# Altium PCB DAQ.PcbDoc
Units mm, origin at the board's own origin, x right, y up, seen from the top; angles counter-clockwise.
Board outline 60 x 100 mm, 4 copper layers (Signal 1, GND 1, GND 2, Signal 2), stack 0.603 mm thick; 40 components, 48 nets, 231 pads, 236 vias.
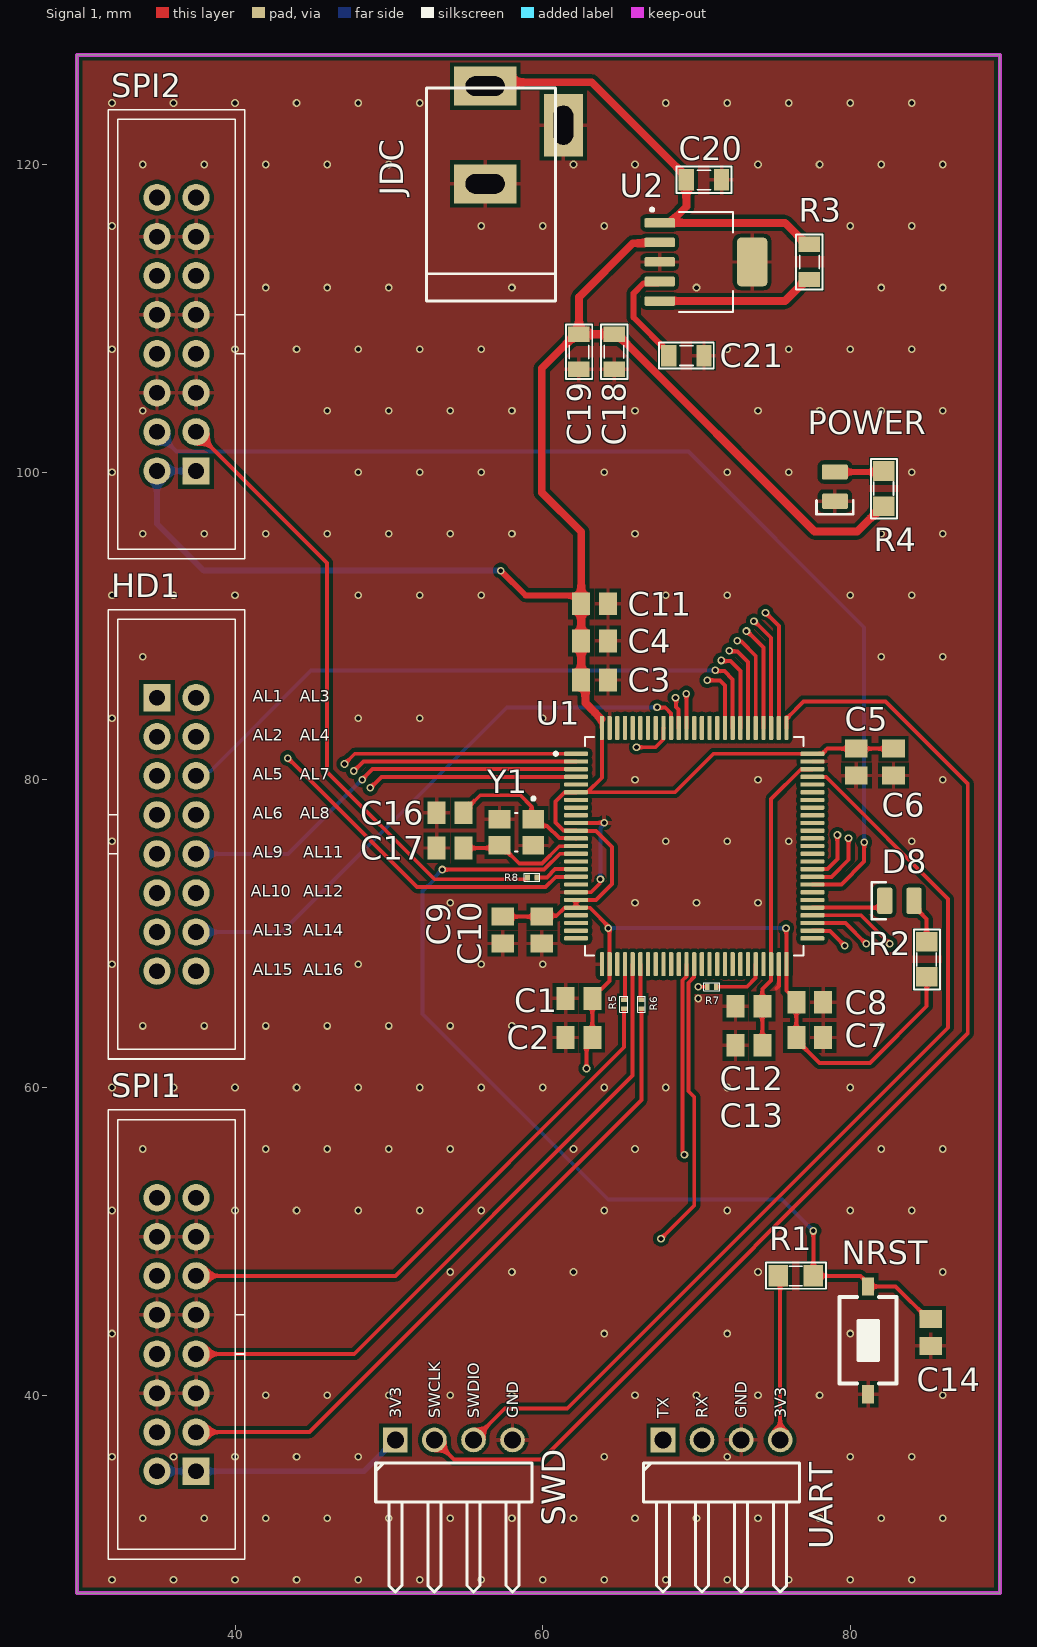
[diagram p0: Signal 1 view]
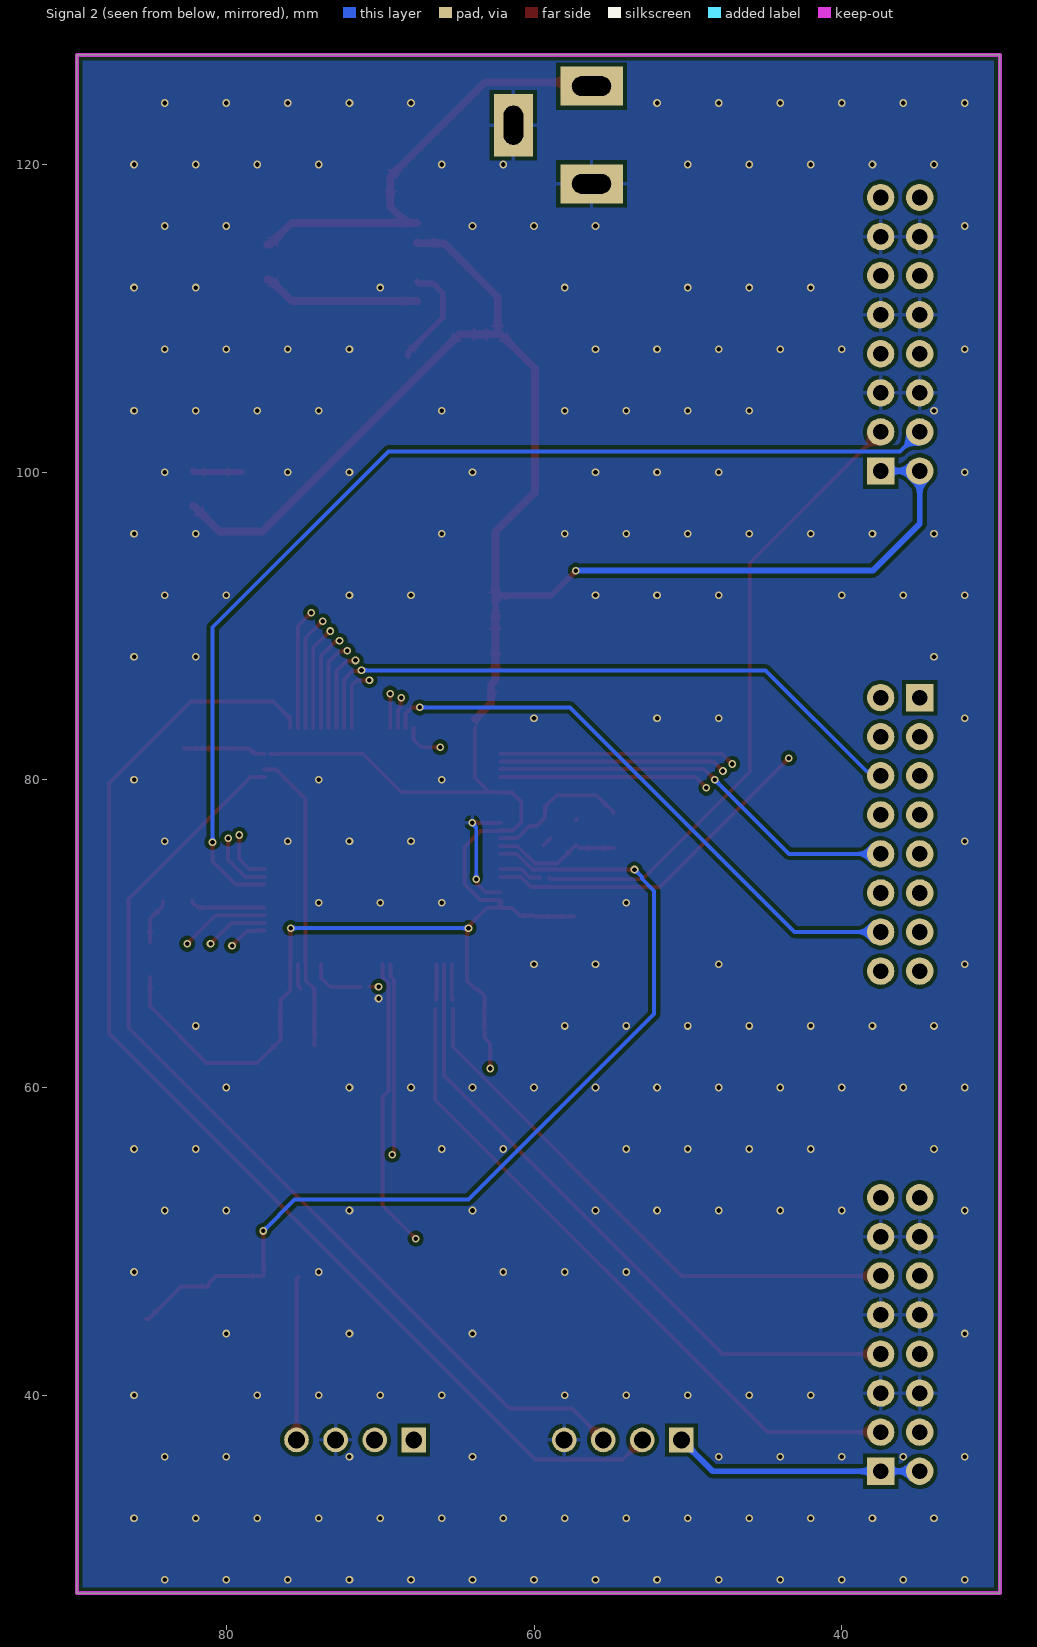
[diagram p1: Signal 2 view, seen from below]
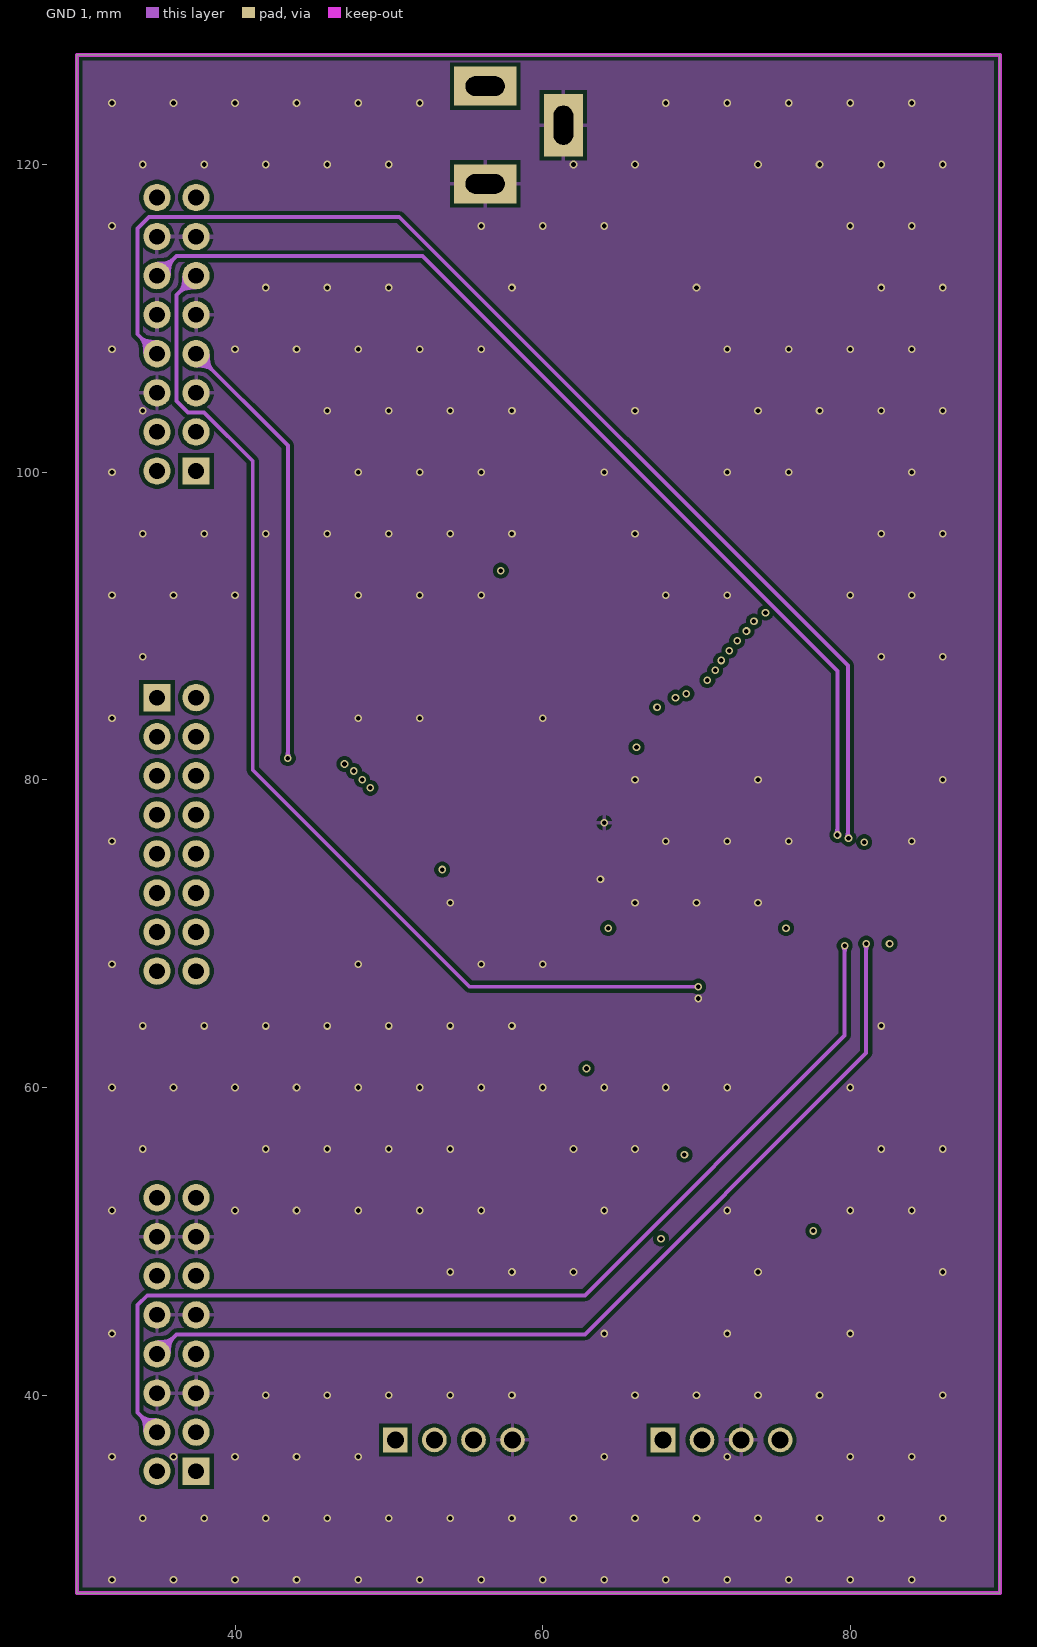
[diagram p2: GND 1]
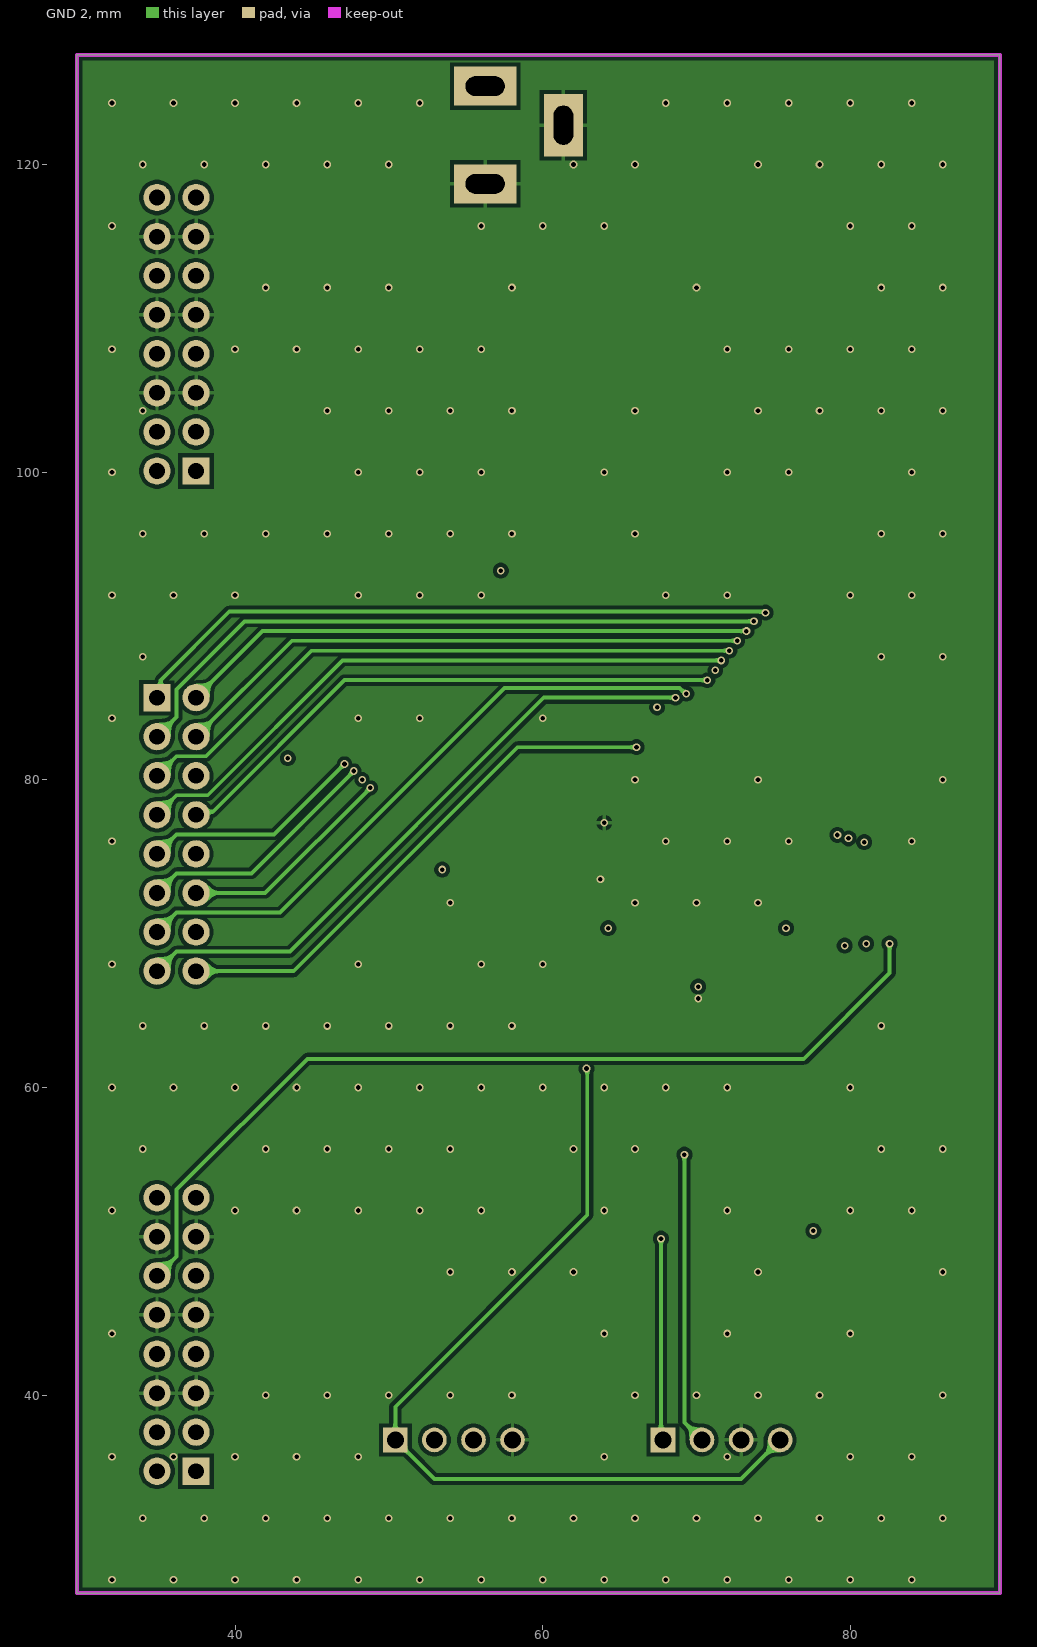
[diagram p3: GND 2]
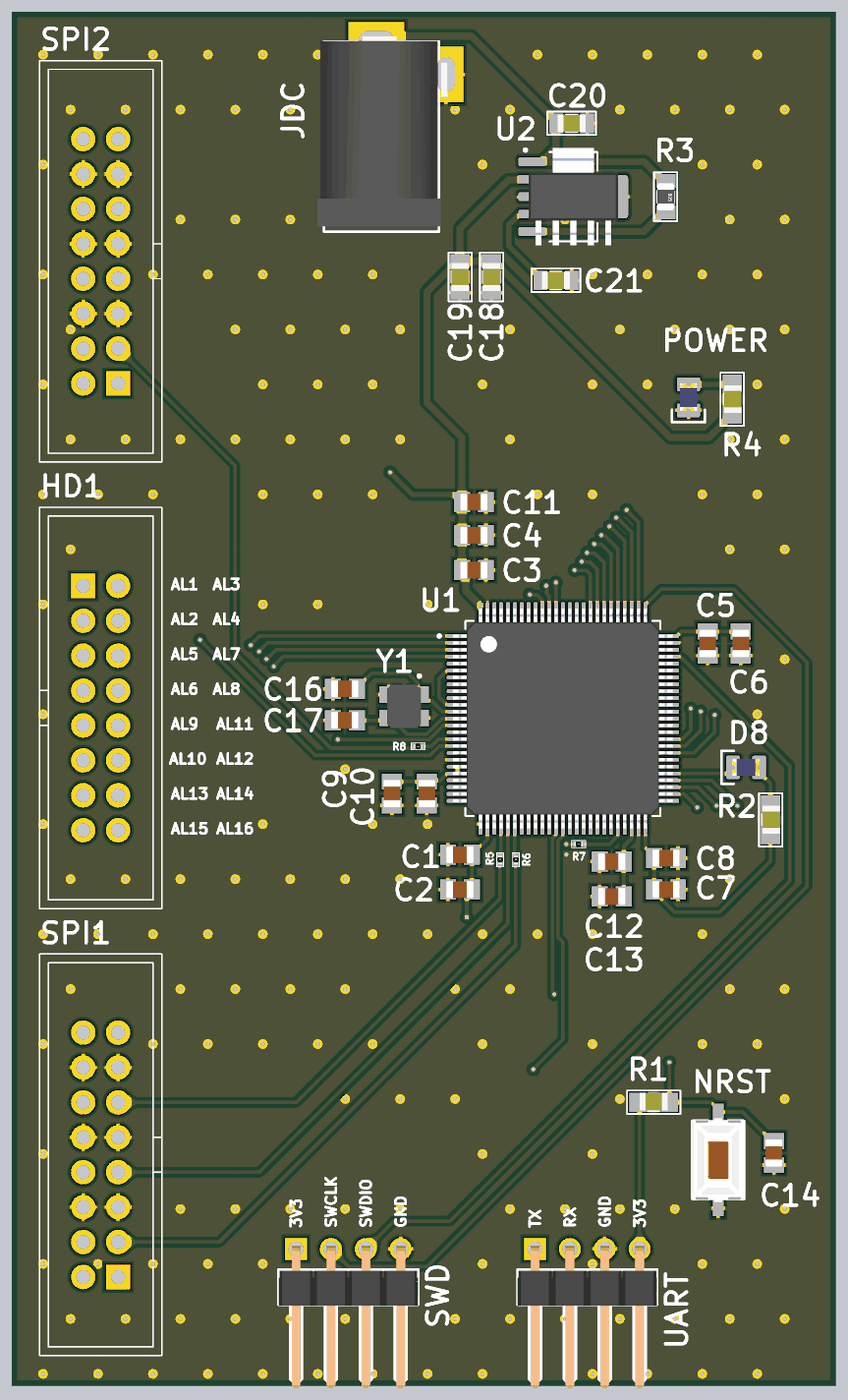
[diagram p4: 3D render of the assembled board from above, using the file's embedded part models]

## Layer stack, top to bottom
Top Solder: solder mask 0.0102, Solder Resist, Dk 3.5
Signal 1: signal copper 0.035
Dielectric 2: prepreg 0.0711, PP-006, Dk 4.1
GND 1: signal copper 0.0356
Dielectric 1: dielectric 0.32, FR-4, Dk 4.8
GND 2: signal copper 0.0356
Dielectric 3: prepreg 0.0711, PP-006, Dk 4.1
Signal 2: signal copper 0.035
Bottom Solder: solder mask 0.0102, Solder Resist, Dk 3.5

## Board outline
29.718,27.127 29.718,127.127 89.718,127.127 89.718,27.127

## Design rules (kind name [scope] priority, off if disabled: settings)
Clearance [All] p1: gap=0.254 ignorepadtopadclearanceinfootprint=TRUE except(0.127: Arc-Arc Arc-Track Arc-SMDPad Track-Track Track-SMDPad SMDPad-SMDPad)
PolygonConnect [All] p1: connectstyle=Relief reliefconductorwidth=0.254 reliefentries=4 polygonreliefangle="90 Angle" airgapwidth=0.254
RoutingVias [All] p1: holewidth=0.3 width=0.5 viastyle="Through Hole" minholewidth=0.2 minwidth=0.3 maxholewidth=0.711 maxwidth=1.277
SolderMaskExpansion [All] p1: expansion=0.102 istentingtop=FALSE
UnRoutedNet [All] p1: checkbadconnections=TRUE
Width [All] p1: maxlimit=1.27 minlimit=0.254 preferedwidth=0.254 minimp=50.000000 maximp=50.000000 favimp=50.000000
29 further rules are at their usual default settings.

## Classes and differential pairs
component class POWER: C18 C19 C20 C21 JDC POWER R3 R4 U2
component class MCU: C1 C2 C3 C4 C5 C6 C7 C8 C9 C10 C11 C12 C13 C14 C16 C17 D8 HD1 NRST R1 R2 R5 R6 R7 R8 spi1 SPI1 SPI2 SWD U1 UART Y1

## Components (designator, comment, footprint, x,y, rotation, side; value= is the part's Value field where it differs from the comment)
C1 "100nF" CAPC2012X145N 62.357,65.786 r0 top
C2 "100nF" CAPC2012X145N 62.357,63.246 r0 top
C3 "100nF" CAPC2012X145N 63.373,86.487 r180 top
C4 "100nF" CAPC2012X145N 63.373,89.027 r180 top
C5 "100nF" CAPC2012X145N 80.391,81.153 r90 top
C6 "100nF" CAPC2012X145N 82.804,81.153 r90 top
C7 "100nF" CAPC2012X145N 77.361,63.246 r180 top
C8 "100nF" CAPC2012X145N 77.361,65.532 r180 top
C9 "100nF" CAPC2012X145N 57.404,70.231 r90 top
C10 "100nF" CAPC2012X145N 59.944,70.231 r90 top
C11 "4.7uF" CAPC2012X145N 63.373,91.44 r180 top
C12 "2.2uF" CAPC2012X145N 73.406,65.278 r0 top
C13 "2.2uF" CAPC2012X145N 73.406,62.738 r0 top
C14 "100nF" CAPC2012X145N 85.217,44.069 r90 top
C16 "10pF" CAPC2012X145N 53.975,77.851 r0 top
C17 "10pF" CAPC2012X145N 53.975,75.565 r0 top
C18 "1uF" CAP_0805 64.643,107.823 r90 top value=33p
C19 "1uF" CAP_0805 62.357,107.823 r90 top value=33p
C20 "1uF" CAP_0805 70.485,118.999 r180 top value=33p
C21 "1uF" CAP_0805 69.342,107.569 r180 top value=33p
D8 "BLUE" LED_0805_BLUE 83.185,72.136 r0 top
HD1 "IDC 8X2" IDC16 34.925,85.344 r270 top value="Header 5x2"
JDC "Jac DC" DC-IN 58.801,121.92 r90 top
NRST "SW-SMD" SW-SMD 81.153,43.561 r270 top
POWER "BLUE" LED_0805_BLUE 78.994,99.06 r90 top
R1 "10K" SM-0805 76.454,47.752 r180 top value=1K
R2 "1K" SM-0805 84.963,68.326 r90 top
R3 "0R" RES-SMD-0805 77.343,113.665 r270 top
R4 "1K" SM-0805 82.169,98.933 r90 top
R5 "22R" RES-SMD-0201 65.278,65.405 r270 top
R6 "22R" RES-SMD-0201 66.421,65.405 r270 top
R7 "22R" RES-SMD-0201 70.993,66.548 r180 top
R8 "22R" RES-SMD-0201 59.309,73.66 r180 top
SPI1 "IDC 8X2" IDC16 37.465,35.052 r90 top value="Header 5x2"
SPI2 "IDC 8X2" IDC16 37.465,100.076 r90 top value="Header 5x2"
SWD "JP4" JP4-D1C 59.309,34.544 r0 top
U1 "STM32H743VIT6" QFP50P1600X1600X160-100N 69.85,75.692 r0 top
U2 "TPS73733DCQ" SOT127P706X180-6N 70.612,113.665 r0 top
UART "JP4" JP4-D1C 76.708,34.544 r0 top
Y1 "25MHz" XTAL_ABM8G-25.000MHZ-B4Y-T 58.293,76.581 r270 top

## Footprints (in the part's own frame and the unit in brackets; to place one, negate y for a bottom-side part, rotate by r counter-clockwise, add the part's x,y. Pads: shape width x height; smd on the part's side, far side on the other; paste and mask are expansions set on the pad)
CAP_0805 [mil]
  rect 39.37x55 smd: 1(-45,0) 2(45,0)
  silkscreen extent -70,-34 70,33, body extent -40,-25 40,25, height 24
CAPC2012X145N [mm]
  rect 1.17x1.47 smd: 1(-0.871,0) 2(0.871,0)
  body extent -1,-0.63 1,0.63, height 1.45
DC-IN [mil] "Jac DC input"
  rect 100x160 hole 50 slot 100 at 90 deg: 1(125,100) 2(-125,100)
  rect 160x100 hole 50 slot 100 at 0 deg: 3(25,-100)
  silkscreen extent -425,-80 120,250, body extent -410,-105 134,269, height 434
IDC16 [mil]
  rect 70x70 hole 40: 1(0,0)
  round 70 hole 40: 2(0,100) 3(100,0) 4(100,100) 5(200,0) 6(200,100) 7(300,0) 8(300,100) 9(400,0) 10(400,100) 11(500,0) 12(500,100) 13(600,0) 14(600,100) 15(700,0) 16(700,100)
  silkscreen extent -225,-125 925,225, body extent -225,-125 926,225, height 358
JP4-D1C [mm] "4 pins, 1 row, right angled, gold plating"
  rect 1.6x1.6 hole 1.1: 1(-8.89,2.54)
  round 1.6 hole 1.1: 2(-6.35,2.54) 3(-3.81,2.54) 4(-1.27,2.54)
  silkscreen extent -10.16,-7.34 0,1.04, body extent -10.16,-7.57 0,2.79, height 2.54
LED_0805_BLUE [mm]
  rrect25% 1x1.7 smd: A(0.95,0) K(-0.95,0)
  silkscreen extent -1.8,-1.2 -0.9,1.2, body extent -1,-0.63 1,0.63, height 1.12
QFP50P1600X1600X160-100N [mm]
  rrect50% 1.56x0.28 smd: 1(-7.68,6) 2(-7.68,5.5) 3(-7.68,5) 4(-7.68,4.5) 5(-7.68,4) 6(-7.68,3.5) 7(-7.68,3) 8(-7.68,2.5) 9(-7.68,2) 10(-7.68,1.5) 11(-7.68,1) 12(-7.68,0.5) 13(-7.68,0) 14(-7.68,-0.5) 15(-7.68,-1) 16(-7.68,-1.5) 17(-7.68,-2) 18(-7.68,-2.5) 19(-7.68,-3) 20(-7.68,-3.5) 21(-7.68,-4) 22(-7.68,-4.5) 23(-7.68,-5) 24(-7.68,-5.5) 25(-7.68,-6) 51(7.68,-6) 52(7.68,-5.5) 53(7.68,-5) 54(7.68,-4.5) 55(7.68,-4) 56(7.68,-3.5) 57(7.68,-3) 58(7.68,-2.5) 59(7.68,-2) 60(7.68,-1.5) 61(7.68,-1) 62(7.68,-0.5) 63(7.68,0) 64(7.68,0.5) 65(7.68,1) 66(7.68,1.5) 67(7.68,2) 68(7.68,2.5) 69(7.68,3) 70(7.68,3.5) 71(7.68,4) 72(7.68,4.5) 73(7.68,5) 74(7.68,5.5) 75(7.68,6)
  rrect50% 0.28x1.56 smd: 26(-6,-7.68) 27(-5.5,-7.68) 28(-5,-7.68) 29(-4.5,-7.68) 30(-4,-7.68) 31(-3.5,-7.68) 32(-3,-7.68) 33(-2.5,-7.68) 34(-2,-7.68) 35(-1.5,-7.68) 36(-1,-7.68) 37(-0.5,-7.68) 38(0,-7.68) 39(0.5,-7.68) 40(1,-7.68) 41(1.5,-7.68) 42(2,-7.68) 43(2.5,-7.68) 44(3,-7.68) 45(3.5,-7.68) 46(4,-7.68) 47(4.5,-7.68) 48(5,-7.68) 49(5.5,-7.68) 50(6,-7.68) 76(6,7.68) 77(5.5,7.68) 78(5,7.68) 79(4.5,7.68) 80(4,7.68) 81(3.5,7.68) 82(3,7.68) 83(2.5,7.68) 84(2,7.68) 85(1.5,7.68) 86(1,7.68) 87(0.5,7.68) 88(0,7.68) 89(-0.5,7.68) 90(-1,7.68) 91(-1.5,7.68) 92(-2,7.68) 93(-2.5,7.68) 94(-3,7.68) 95(-3.5,7.68) 96(-4,7.68) 97(-4.5,7.68) 98(-5,7.68) 99(-5.5,7.68) 100(-6,7.68)
  silkscreen extent -9.1,-7.1 7.1,7.1, body extent -8,-8 8,8, height 1.6
RES-SMD-0201 [mm]
  rect 0.3x0.4 smd: 1(-0.3,0) 2(0.3,0)
  silkscreen extent -0.51,-0.25 0.51,0.25, body extent -0.3,-0.15 0.3,0.15, height 0.22
RES-SMD-0805 [mil]
  rect 39.37x55 smd: 1(-45,0) 2(45,0)
  silkscreen extent -70,-34 70,33, body extent -39,-25 39,25, height 31
SM-0805 [mil] "Compoment SMD 80x50mil"
  rect 50x55 smd: 1(-45,0) 2(45,0)
  silkscreen extent -77,-34 76,33, body extent -40,-27 40,23, height 24
SOT127P706X180-6N [mm]
  rrect25% 1.97x0.62 smd: 1(-3.005,2.54) 2(-3.005,1.27) 3(-3.005,0) 4(-3.005,-1.27) 5(-3.005,-2.54)
  rrect25% 1.97x3.16 smd: 6(3.005,0)
  silkscreen extent -3.6,-3.25 1.75,3.5, body extent -3.25,-3.53 3.25,3.53, height 1.8
SW-SMD [mm] "Switch SMD type"
  rect 1.2x0.8 smd: 1(-3.5,0) 2(3.5,0)
  silkscreen extent -2.82,-1.85 2.82,1.85, body extent -3.05,-1.85 3.05,1.85, height 2.5
XTAL_ABM8G-25.000MHZ-B4Y-T [mm]
  rect 1.2x1.4 smd: 1(-0.85,1.1) 2(-0.85,-1.1) 3(0.85,-1.1) 4(0.85,1.1)
  silkscreen extent -2.3,-0.08 1.25,1.2, body extent -1.6,-1.24 1.6,1.24, height 0.99

## Part data
C1 C2 C3 C4 C5 C6 C7 C8 C9 C10 C12 C13 C14 C16 C17: library part VJ0805A390GXCAP, "39 pF Â±2% 200V Ceramic Capacitor C0G, NP0 0805 (2012 Metric)", Package="2012 Vishay Vitramon", Check_prices=https://www.snapeda.com/parts/VJ0805A390GXCAP/Vishay/view-part/?ref=eda, MF="Vishay Vitramon", MP=VJ0805A390GXCAP, SnapEDA_Link=https://www.snapeda.com/parts/VJ0805A390GXCAP/Vishay/view-part/?ref=snap
C11: library part CAP_TAN_SMD, "Polazied Tantalum Capacitor"
C18 C19 C20 C21: library part CapSMD, "Capacitor", LatestRevisionDate=17-Jul-2002, LatestRevisionNote="Re-released for DXP Platform.", PackageReference=RAD-0.3, Published=8-Jun-2000, Publisher="Altium Limited"
D8 POWER: library part LED_0805_BLUE, "LED 0805 BLUE SMD"
HD1 SPI1 SPI2: library part "IDC 8x2"
JDC: library part DCIN, "Jac DC input"
NRST: "Switch", LatestRevisionDate=17-Jul-2002, LatestRevisionNote="Re-released for DXP Platform.", PackageReference=SPST-2, Published=24-Mar-1999, Publisher="Altium Limited"
R1 R2 R4: library part RM, "Resistor SMD"
R3 R5 R6 R7 R8: library part "Resistor - SMD", "Resistor SMD", Manufacturer="Generic Components", Class=Passive, Published=08/06/2000, Publisher="Altium Hobart Technology Centre"
SWD UART: "WR-PHD 2.54 mm Angled Socket Header", Manufacturer="W¨¹rth Elektronik eiSos GmbH", partNo=613004143121, ComponentLink1 Description=Manufacturer, ComponentLink1URL=http://www.we-online.com, ComponentLink2 Description=Datasheet, ComponentLink2URL=http://katalog.we-online.de/em/datasheet/6130xx143121.pdf, Created by="Karrer Zheng", Created Date="29 March 2013", NoPins=04
U1: "ARMÂ® CortexÂ®-M7 STM32H7 Microcontroller IC 32-Bit Single-Core 480MHz 2MB (2M x 8) FLASH 100-LQFP (14x14)", Package="LQFP-100 STMicroelectronics", Check_prices=https://www.snapeda.com/parts/STM32H743VIT6/STMicroelectronics/view-part/?ref=eda, MF=STMicroelectronics, MP=STM32H743VIT6, SnapEDA_Link=https://www.snapeda.com/parts/STM32H743VIT6/STMicroelectronics/view-part/?ref=snap
U2: "1-A, ultra-low-dropout voltage regulator with reverse current protection & enable", Package="SOT-223-6 Texas Instruments", Check_prices=https://www.snapeda.com/parts/TPS73733DCQ/Texas+Instruments/view-part/?ref=eda, MF="Texas Instruments", MP=TPS73733DCQ, SnapEDA_Link=https://www.snapeda.com/parts/TPS73733DCQ/Texas+Instruments/view-part/?ref=snap
Y1: library part ABM8G-25.000MHZ-B4Y-T, "25 MHz Â±30ppm Crystal 10pF 60 Ohms 4-SMD, No Lead", Package="SMD-4 Abracon", Availability="In Stock", Check_prices=https://www.snapeda.com/parts/ABM8G-25.000MHZ-B4Y-T/Abracon+LLC/view-part/?ref=eda, MF=Abracon, MP=ABM8G-25.000MHZ-B4Y-T, Price=None, Purchase-URL=https://pricing.snapeda.com/search/part/ABM8G-25.000MHZ-B4Y-T/?ref=eda, SnapEDA_Link=https://www.snapeda.com/parts/ABM8G-25.000MHZ-B4Y-T/Abracon+LLC/view-part/?ref=snap

## Via types
v1: diameter 0.5, hole 0.3, Signal 1 to Signal 2, 201 vias
v2: diameter 0.5, hole 0.3, Signal 1 to Signal 2, tented top, 35 vias

## Nets (pads, with @x,y where several pads share a name; then routed paths per layer and width w, separated by ;. In a path a pad name is that pad's centre, name@x,y a point inside that pad or via, vN(x,y) a via of type N, cw(c..) or ccw(c..) an arc to the next point about the centre after c; other vN are vias at no path point)
3V3: C1.2 C2.2 C3.2 C4.2 C5.2 C6.2 C7.2 C8.2 C9.2 C10.2 C11.2 C18.2 C19.2 R1.2 R2.1 R4.1 SPI1.1 SPI1.2 SPI2.1 SPI2.2 SWD.1 U1.6 U1.11 U1.20 U1.21 U1.27 U1.50 U1.75 U1.100 U2.2 UART.4 | length 270.3
  Signal 1 w0.254: C9.2 C10.2 60.013,71.171 60.911,71.171 61.419,71.679 U1.21@62.182,71.679 ; U1.11@62.157,76.705 61.363,76.705 60.833,77.235 60.833,78.593 61.419,79.179 62.157,79.179 U1.6 68.606,79.192 71.106,81.692 77.135,81.692 77.148,81.679 U1.75@76.779,81.679 ; U1.21 U1.20 63.47,72.192 64.516,73.238 64.516,75.634 63.471,76.679 62.183,76.679 U1.11@62.18,76.682 ; U1.21@62.182,71.68 63.067,71.68 64.35,70.397 U1.27 64.35,66.908 63.836,66.394 63.686,66.394 63.228,65.936 C1.2 C2.2 62.85,62.868 v2(62.85,61.229) ; U1.6@62.921,79.205 63.85,80.134 U1.100 ; R1.2@75.311,47.688 75.438,47.561 UART.4 ; v2(75.819,70.358) 75.837,70.34 75.837,68.025 U1.50 75.85,66.289 75.999,66.14 76.032,66.14 76.49,65.682 C8.2 C7.2 76.49,63.096 77.991,61.595 81.28,61.595 84.963,65.278 R2.1 ; U1.75 78.17,81.692 78.502,82.024 C5.2 C6.2
  Signal 1 w0.381: v2(57.277,93.599) 58.892,91.984 62.108,91.984 62.502,91.59 C11.2 C11.2@62.502,90.932
  Signal 1 w0.508: C11.2@62.502,90.932 C4.2 C3.2 62.786,86.203 62.786,84.99 U1.100@63.829,83.947 ; C11.2@62.502,91.59 62.502,96.121 59.944,98.679 59.944,106.751 62.159,108.966 C19.2 ; U2.2 67.551,114.879 65.857,114.879 62.357,111.379 C19.2 ; R4.1 82.105,97.79 80.454,96.139 77.668,96.139 64.841,108.966 C18.2 C19.2
  GND 2 w0.254: v2(62.85,61.229) 62.897,61.182 62.897,51.721 50.419,39.243 SWD.1 52.959,34.544 72.898,34.544 UART.4
  Signal 2 w0.254: v2(64.262,70.358) v2(75.819,70.358)
  Signal 2 w0.381: SPI1.2 SPI1.1 48.387,35.052 SWD.1 ; SPI2.1 SPI2.2 34.925,96.647 37.973,93.599 v2(57.277,93.599)
5V: C20.2 JDC.1 R3.1 U2.1 | length 29.5
  Signal 1 w0.254: C20.2 C20.2@69.342,119.197
  Signal 1 w0.508: JDC.1 56.515,125.349 63.191,125.349 C20.2@69.342,119.197 ; U2.1 U2.1@68.282,116.205 ; C20.2 69.342,117.265 U2.1@68.282,116.205 ; R3.1 77.145,114.808 75.748,116.205 U2.1@68.282,116.205
A1: SPI1.4 U1.52 | length 70.4
  Signal 1 w0.254: U1.52 78.17,70.192 78.183,70.179 78.665,70.179 v2(79.629,69.215)
  GND 1 w0.254: SPI1.4 33.655,38.862 33.655,45.847 34.29,46.482 62.738,46.482 79.629,63.373 v2(79.629,69.215)
A2: SPI2.4 U1.58 | length 70.5
  Signal 1 w0.254: U1.58 79.415,73.192 80.899,74.676 v2(80.899,75.946)
  Signal 2 w0.254: SPI2.4 36.195,101.346 36.939,101.346 37.991,101.346 69.469,101.346 80.899,89.916 v2(80.899,75.946)
AL1: HD1.1 U1.77 | length 50.3
  Signal 1 w0.254: v2(74.484,90.867) 75.35,90.001 U1.77
  GND 2 w0.254: HD1.1 35.157,85.576 35.157,86.465 39.624,90.932 74.245,90.932 74.263,90.914 74.437,90.914 v2(74.484,90.867)
AL2: HD1.3 U1.78 | length 50.4
  Signal 1 w0.254: v2(73.733,90.301) 73.786,90.301 74.85,89.237 U1.78
  GND 2 w0.254: HD1.3 36.195,84.074 36.195,85.87 40.626,90.301 v2(73.733,90.301)
AL3: HD1.2 U1.79 | length 44.3
  Signal 1 w0.254: v2(73.245,89.67) 73.274,89.67 74.35,88.594 U1.79
  GND 2 w0.254: HD1.2 41.791,89.67 v2(73.245,89.67)
AL4: HD1.4 U1.80 | length 44.1
  Signal 1 w0.254: v2(72.643,89.039) 72.69,88.992 72.918,88.992 73.85,88.06 U1.80
  GND 2 w0.254: HD1.4 43.7,89.039 v2(72.643,89.039)
AL5: HD1.5 U1.81 | length 46.4
  Signal 1 w0.254: v2(72.136,88.392) 72.183,88.345 72.673,88.345 73.35,87.668 U1.81
  GND 2 w0.254: HD1.5 36.195,81.534 38.1,81.534 44.958,88.392 v2(72.136,88.392)
AL6: HD1.7 U1.82 | length 46.1
  Signal 1 w0.254: v2(71.603,87.761) 71.65,87.714 72.203,87.714 72.85,87.066 U1.82
  GND 2 w0.254: HD1.7 36.195,78.994 38.227,78.994 46.994,87.761 v2(71.603,87.761)
AL7: HD1.6 U1.83 | length 41.1
  Signal 1 w0.254: v2(71.218,87.113) 71.265,87.066 71.816,87.066 72.35,86.532 U1.83
  Signal 2 w0.254: HD1.6 37.757,80.556 38.392,80.556 44.949,87.113 v2(71.218,87.113)
AL8: HD1.8 U1.84 | length 40.9
  Signal 1 w0.254: v2(70.7,86.482) 70.721,86.46 71.528,86.46 71.85,86.138 U1.84
  GND 2 w0.254: HD1.8 37.665,77.924 38.554,77.924 47.112,86.482 v2(70.7,86.482)
AL9: HD1.9 U1.1 | length 29.9
  Signal 1 w0.254: v2(47.117,81.026) 47.783,81.692 U1.1
  GND 2 w0.254: HD1.9 36.195,76.454 38.735,76.454 42.545,76.454 v2(47.117,81.026)
AL10: HD1.11 U1.2 | length 30.8
  Signal 1 w0.254: v2(47.72,80.574) 48.339,81.192 U1.2
  GND 2 w0.254: HD1.11 36.195,73.914 41.061,73.914 v2(47.72,80.574)
AL11: HD1.10 U1.3 | length 27
  Signal 1 w0.254: v2(48.26,80.01) 48.942,80.692 U1.3
  Signal 2 w0.254: HD1.10 43.434,75.184 v2(48.26,80.01)
AL12: HD1.12 U1.4 | length 27.8
  Signal 1 w0.254: v2(48.793,79.477) 49.508,80.192 U1.4
  GND 2 w0.254: HD1.12 41.96,72.644 v2(48.793,79.477)
AL13: HD1.13 U1.89 | length 43.4
  Signal 1 w0.254: v2(69.342,85.598) 69.346,85.594 69.346,83.376 U1.89
  GND 2 w0.254: HD1.13 36.195,71.374 42.926,71.374 57.515,85.963 67.005,85.963 67.018,85.975 68.898,85.975 69.275,85.598 v2(69.342,85.598)
AL14: HD1.15 U1.90 | length 43.1
  Signal 1 w0.254: v2(68.632,85.344) 68.679,85.297 68.679,84.737 68.842,84.574 68.842,83.38 U1.90
  GND 2 w0.254: HD1.15 36.195,68.834 43.561,68.834 60.071,85.344 v2(68.632,85.344)
AL15: HD1.14 U1.91 | length 38
  Signal 1 w0.254: v2(67.437,84.713) 67.462,84.688 67.966,84.688 68.35,84.304 U1.91
  Signal 2 w0.254: HD1.14 43.053,70.104 57.662,84.713 v2(67.437,84.713)
AL16: HD1.16 U1.92 | length 37.4
  Signal 1 w0.254: v2(66.1,82.117) 67.333,82.117 67.837,82.621 67.837,83.359 U1.92
  GND 2 w0.254: HD1.16 43.815,67.564 58.368,82.117 v2(66.1,82.117)
B1: SPI1.8 U1.53 | length 65.4
  Signal 1 w0.254: U1.53 79.676,70.692 v2(81.026,69.342)
  GND 1 w0.254: SPI1.8 36.195,43.942 62.738,43.942 81.026,62.23 v2(81.026,69.342)
B2: SPI2.8 U1.59 | length 82.7
  Signal 1 w0.254: U1.59 78.772,73.692 79.883,74.803 v2(79.883,76.2)
  GND 1 w0.254: SPI2.8 33.655,108.966 33.655,115.842 34.399,116.586 50.673,116.586 79.836,87.423 79.836,76.247 v2(79.883,76.2)
C1: SPI1.12 U1.54 | length 66
  Signal 1 w0.254: U1.54 80.7,71.192 v2(82.55,69.342)
  GND 2 w0.254: SPI1.12 36.195,49.022 36.195,53.358 44.697,61.86 76.973,61.86 82.55,67.437 v2(82.55,69.342)
C2: SPI2.12 U1.60 | length 70.1
  Signal 1 w0.254: U1.60 78.51,74.192 79.16,74.842 v2(79.16,76.415)
  GND 1 w0.254: SPI2.12 36.195,114.046 52.197,114.046 79.16,87.083 v2(79.16,76.415)
GND: C1.1 C2.1 C3.1 C4.1 C5.1 C6.1 C7.1 C8.1 C9.1 C10.1 C11.1 C12.1 C13.1 C14.1 C16.1 C17.1 C18.1 C19.1 C20.1 C21.1 JDC.2 JDC.3 NRST.2 POWER.K SPI1.5 SPI1.6 SPI1.9 SPI1.10 SPI1.13 SPI1.14 SPI2.5 SPI2.6 SPI2.9 SPI2.10 SPI2.13 SPI2.14 SWD.4 U1.10 U1.19 U1.26 U1.49 U1.74 U1.99 U2.3 U2.6 UART.3 Y1.2 Y1.4 | length 10.1
  Signal 1 w0.254: Y1.2 Y1.2@57.293,77.431 ; Y1.4@58.92,76.204 Y1.4 ; U1.19 63.143,72.692 63.707,73.256 63.707,73.486 v2(63.754,73.533) ; U1.10 62.182,77.204 63.996,77.204 v2(64.008,77.216) ; 75.184,66.421 75.35,66.587 U1.49
  Signal 2 w0.254: v2(63.754,73.533) 63.754,76.895 64.008,77.149 v2(64.008,77.216)
  other v1: 32,28 36,28 40,28 44,28 48,28 52,28 56,28 60,28 64,28 68,28 72,28 76,28 80,28 84,28 34,32 38,32 42,32 46,32 50,32 54,32 58,32 62,32 66,32 70,32 74,32 78,32 82,32 86,32 32,36 36,36 40,36 44,36 48,36 64,36 72,36 80,36 84,36 42,40 46,40 50,40 54,40 58,40 66,40 70,40 74,40 78,40 86,40 32,44 64,44 72,44 80,44 54,48 58,48 62,48 74,48 86,48 32,52 40,52 44,52 48,52 52,52 56,52 64,52 72,52 80,52 84,52 34,56 42,56 46,56 50,56 54,56 62,56 66,56 82,56 86,56 32,60 36,60 40,60 44,60 48,60 52,60 56,60 60,60 64,60 68,60 72,60 80,60 34,64 38,64 42,64 46,64 50,64 54,64 58,64 82,64 32,68 48,68 56,68 60,68 54,72 66,72 70,72 74,72 32,76 68,76 72,76 76,76 84,76 66,80 74,80 86,80 32,84 48,84 52,84 60,84 34,88 82,88 86,88 32,92 36,92 40,92 48,92 52,92 56,92 68,92 72,92 80,92 84,92 34,96 38,96 42,96 46,96 50,96 54,96 58,96 66,96 82,96 86,96 32,100 48,100 52,100 56,100 64,100 72,100 76,100 84,100 34,104 46,104 50,104 54,104 58,104 66,104 74,104 78,104 82,104 86,104 32,108 40,108 44,108 48,108 52,108 56,108 72,108 76,108 80,108 84,108 42,112 46,112 50,112 58,112 70,112 82,112 86,112 32,116 56,116 60,116 64,116 80,116 84,116 34,120 38,120 42,120 46,120 50,120 62,120 66,120 74,120 78,120 82,120 86,120 32,124 36,124 40,124 44,124 48,124 52,124 68,124 72,124 76,124 80,124 84,124
  other v2: 70.104,65.786
HSE_IN: C16.2 U1.12 Y1.1 | length 9.4
  Signal 1 w0.254: C16.2 54.846,77.901 55.939,78.994 58.547,78.994 59.278,78.263 59.278,77.546 59.827,76.997 60.29,76.997 61.082,76.205 62.157,76.205 U1.12
HSE_OUT: C17.2 U1.13 Y1.3 | length 8.4
  Signal 1 w0.254: C17.2@54.825,75.586 C17.2 57.027,75.565 Y1.3 57.293,75.731 58.475,74.549 59.944,74.549 61.074,75.679 62.157,75.679 U1.13
LED: D8.K U1.55 | length 4.9
  Signal 1 w0.254: U1.55 81.862,71.692 82.235,72.065 D8.K
NetC21_2: C21.2 U2.4 | length 7
  Signal 1 w0.381: U2.4 67.488,112.276 66.556,112.276 65.913,111.633 65.913,110.054 68.199,107.767 C21.2
NetD8_A: D8.A R2.2 | length 3
  Signal 1 w0.254: D8.A 84.135,71.786 84.963,70.958 R2.2
NetPOWER_A: POWER.A R4.2 | length 3.2
  Signal 1 w0.381: POWER.A 82.103,100.01 R4.2
NetR3_2: R3.2 U2.5 | length 10.3
  Signal 1 w0.508: U2.5 75.747,111.125 77.145,112.522 R3.2
NetR5_1: R5.1 U1.29 | length 2.4
  Signal 1 w0.254: R5.1 65.327,65.705 65.35,65.728 U1.29
NetR6_1: R6.1 U1.31 | length 2.4
  Signal 1 w0.254: U1.31 66.35,65.728 66.373,65.705 R6.1
NetR7_1: R7.1 U1.46 | length 3.7
  Signal 1 w0.254: R7.1 73.279,66.548 73.837,67.106 73.837,67.999 U1.46
NetR8_1: R8.1 U1.16 | length 2.8
  Signal 1 w0.254: R8.1 60.28,73.66 60.812,74.192 U1.16
NRST: C14.2 NRST.1 R1.1 U1.14 | length 62.1
  Signal 1 w0.254: v2(53.467,74.164) 60.098,74.164 61.126,75.192 U1.14 ; v2(77.597,50.673) R1.1 80.662,47.752 81.153,47.261 NRST.1 82.946,47.061 85.067,44.94 C14.2
  Signal 2 w0.254: v2(53.467,74.164) 52.993,73.69 52.993,73.567 52.197,72.771 52.197,64.77 64.262,52.705 75.565,52.705 v2(77.597,50.673)
RX: U1.37 UART.2 | length 31.6
  Signal 1 w0.254: v2(69.215,55.626) 69.215,55.693 69.092,55.816 69.092,66.967 69.337,67.212 69.337,67.999 U1.37
  GND 2 w0.254: v2(69.215,55.626) 69.215,38.227 UART.2
SPI1_MISO: SPI1.7 U1.30 | length 43.1
  Signal 1 w0.254: SPI1.7 47.752,42.672 65.85,60.77 U1.30
SPI1_MOSI: R6.2 SPI1.3 | length 43.8
  Signal 1 w0.254: SPI1.3 44.831,37.592 66.421,59.182 R6.2
SPI1_SCK: R5.2 SPI1.11 | length 36.5
  Signal 1 w0.254: SPI1.11 50.419,47.752 65.278,62.611 R5.2
SPI2_MISO: SPI2.7 U1.17 | length 51.2
  Signal 1 w0.254: v2(43.434,81.407) 51.816,73.025 60.184,73.025 60.851,73.692 U1.17
  GND 1 w0.254: SPI2.7 43.434,101.727 v2(43.434,81.407)
SPI2_MOSI: R8.2 SPI2.3 | length 41.6
  Signal 1 w0.254: SPI2.3 45.974,94.107 45.974,80.518 52.959,73.533 58.882,73.533 58.936,73.587 58.986,73.587 59.009,73.61 R8.2
SPI2_SCK: R7.2 SPI2.11 | length 70.7
  Signal 1 w0.254: v2(70.104,66.548) R7.2
  GND 1 w0.254: SPI2.11 36.195,111.506 36.195,109.132 36.195,105.918 36.195,105.41 36.195,104.63 36.939,103.886 37.991,103.886 41.148,100.729 41.148,80.645 55.245,66.548 v2(70.104,66.548)
SWCLK: SWD.2 U1.76 | length 78
  Signal 1 w0.254: SWD.2 54.229,35.814 59.944,35.814 87.63,63.5 87.63,79.756 82.296,85.09 76.962,85.09 75.897,84.025 75.863,84.025 75.85,84.012 U1.76
SWDIO: SWD.3 U1.72 | length 62.5
  Signal 1 w0.254: SWD.3 57.531,39.116 61.595,39.116 86.36,63.881 86.36,72.263 78.435,80.188 77.534,80.188 U1.72
TX: U1.38 UART.1 | length 32.2
  Signal 1 w0.254: v2(67.691,50.165) 69.85,52.324 69.85,59.378 69.473,59.755 69.473,66.809 69.837,67.173 69.837,67.999 U1.38
  GND 2 w0.254: v2(67.691,50.165) 67.691,37.211 UART.1
VCAP: C12.2 C13.2 U1.48 U1.73 | length 19.7
  Signal 1 w0.254: C13.2 C12.2 74.277,66.394 74.837,66.954 74.837,67.999 U1.48 74.85,78.75 76.779,80.679 77.517,80.679 U1.73
pads on no net: SPI1.15 SPI1.16 SPI2.15 SPI2.16 U1.5 U1.7 U1.8 U1.9 U1.15 U1.18 U1.22 U1.23 U1.24 U1.25 U1.28 U1.32 U1.33 U1.34 U1.35 U1.36 U1.39 U1.40 U1.41 U1.42 U1.43 U1.44 U1.45 U1.47 U1.51 U1.56 U1.57 U1.61 U1.62 U1.63 U1.64 U1.65 U1.66 U1.67 U1.68 U1.69 U1.70 U1.71 U1.85 U1.86 U1.87 U1.88 U1.93 U1.94 U1.95 U1.96 U1.97 U1.98

## Polygon pours and split planes (outlines as drawn)
GND on GND 1 "GND_L02_P001" (solid, remove dead copper, pour order 1): 27.806,127.228 28.949,128.371 94.608,128.371 94.608,23.088 92.83,21.31 25.901,21.31 25.901,125.45 27.933,127.482
GND on GND 2 "GND_L03_P003" (solid, pour order 3): 89.686,27.305 89.559,27.432 89.559,127.127 29.488,127.127 29.615,127 29.615,27.178 89.559,27.178
GND on Signal 2 "GND_L04_P004" (solid, remove dead copper, pour order 4): 23.906,127.53 24.16,127.276 89.819,127.276 89.819,24.914 87.279,22.374 86.644,23.009 25.938,23.009 25.938,127.149 26.319,127.53
GND on Signal 1 "GND_L01_P000" (solid, pour order 0): 29.965,127.292 30.219,127.038 89.655,127.038 89.655,26.962 89.401,27.216 29.711,27.216 29.711,126.911 29.838,127.038

## Keep-outs
Keep-Out Layer:
  the board outline again, w0.254

## Silkscreen, mask and mechanical layers (free items; w line width, h text height)
Top Overlay:
  text "AL1" at 41.148,85.09 h0.76
  text "AL3" at 44.196,85.09 h0.76
  text "AL2" at 41.148,82.55 h0.76
  text "AL4" at 44.196,82.55 h0.76
  text "AL5" at 41.148,80.01 h0.76
  text "AL7" at 44.196,80.01 h0.76
  text "AL6" at 41.148,77.47 h0.76
  text "AL8" at 44.196,77.47 h0.76
  text "AL9" at 41.148,74.93 h0.76
  text "AL11" at 44.45,74.93 h0.76
  text "AL10" at 41.021,72.39 h0.76
  text "AL12" at 44.45,72.39 h0.76
  text "AL13" at 41.148,69.85 h0.76
  text "AL14" at 44.45,69.85 h0.76
  text "AL15" at 41.148,67.31 h0.76
  text "AL16" at 44.45,67.31 h0.76
  text "3V3" at 50.8,38.481 h0.76 r90
  text "SWCLK" at 53.34,38.481 h0.76 r90
  text "SWDIO" at 55.88,38.481 h0.76 r90
  text "GND" at 58.42,38.481 h0.76 r90
  text "TX" at 68.199,38.481 h0.76 r90
  text "RX" at 70.739,38.481 h0.76 r90
  text "GND" at 73.279,38.481 h0.76 r90
  text "3V3" at 75.819,38.481 h0.76 r90

## Text inside footprints (layer, text, board x,y; h text height)
D8: Mechanical 13 "+" at 84.952,73.136 h1
POWER: Mechanical 13 "+" at 77.994,100.827 h1 r90